# Altium PCB ledcube_v2.PcbDoc (part 4 of 18)
Units mil, origin at the board's own origin, x right, y up, seen from the top; angles counter-clockwise.
Board outline 3130 x 3300 mil, 2 copper layers (Top Layer, Bottom Layer); 188 components, 216 nets, 29515 pads, 250 vias.
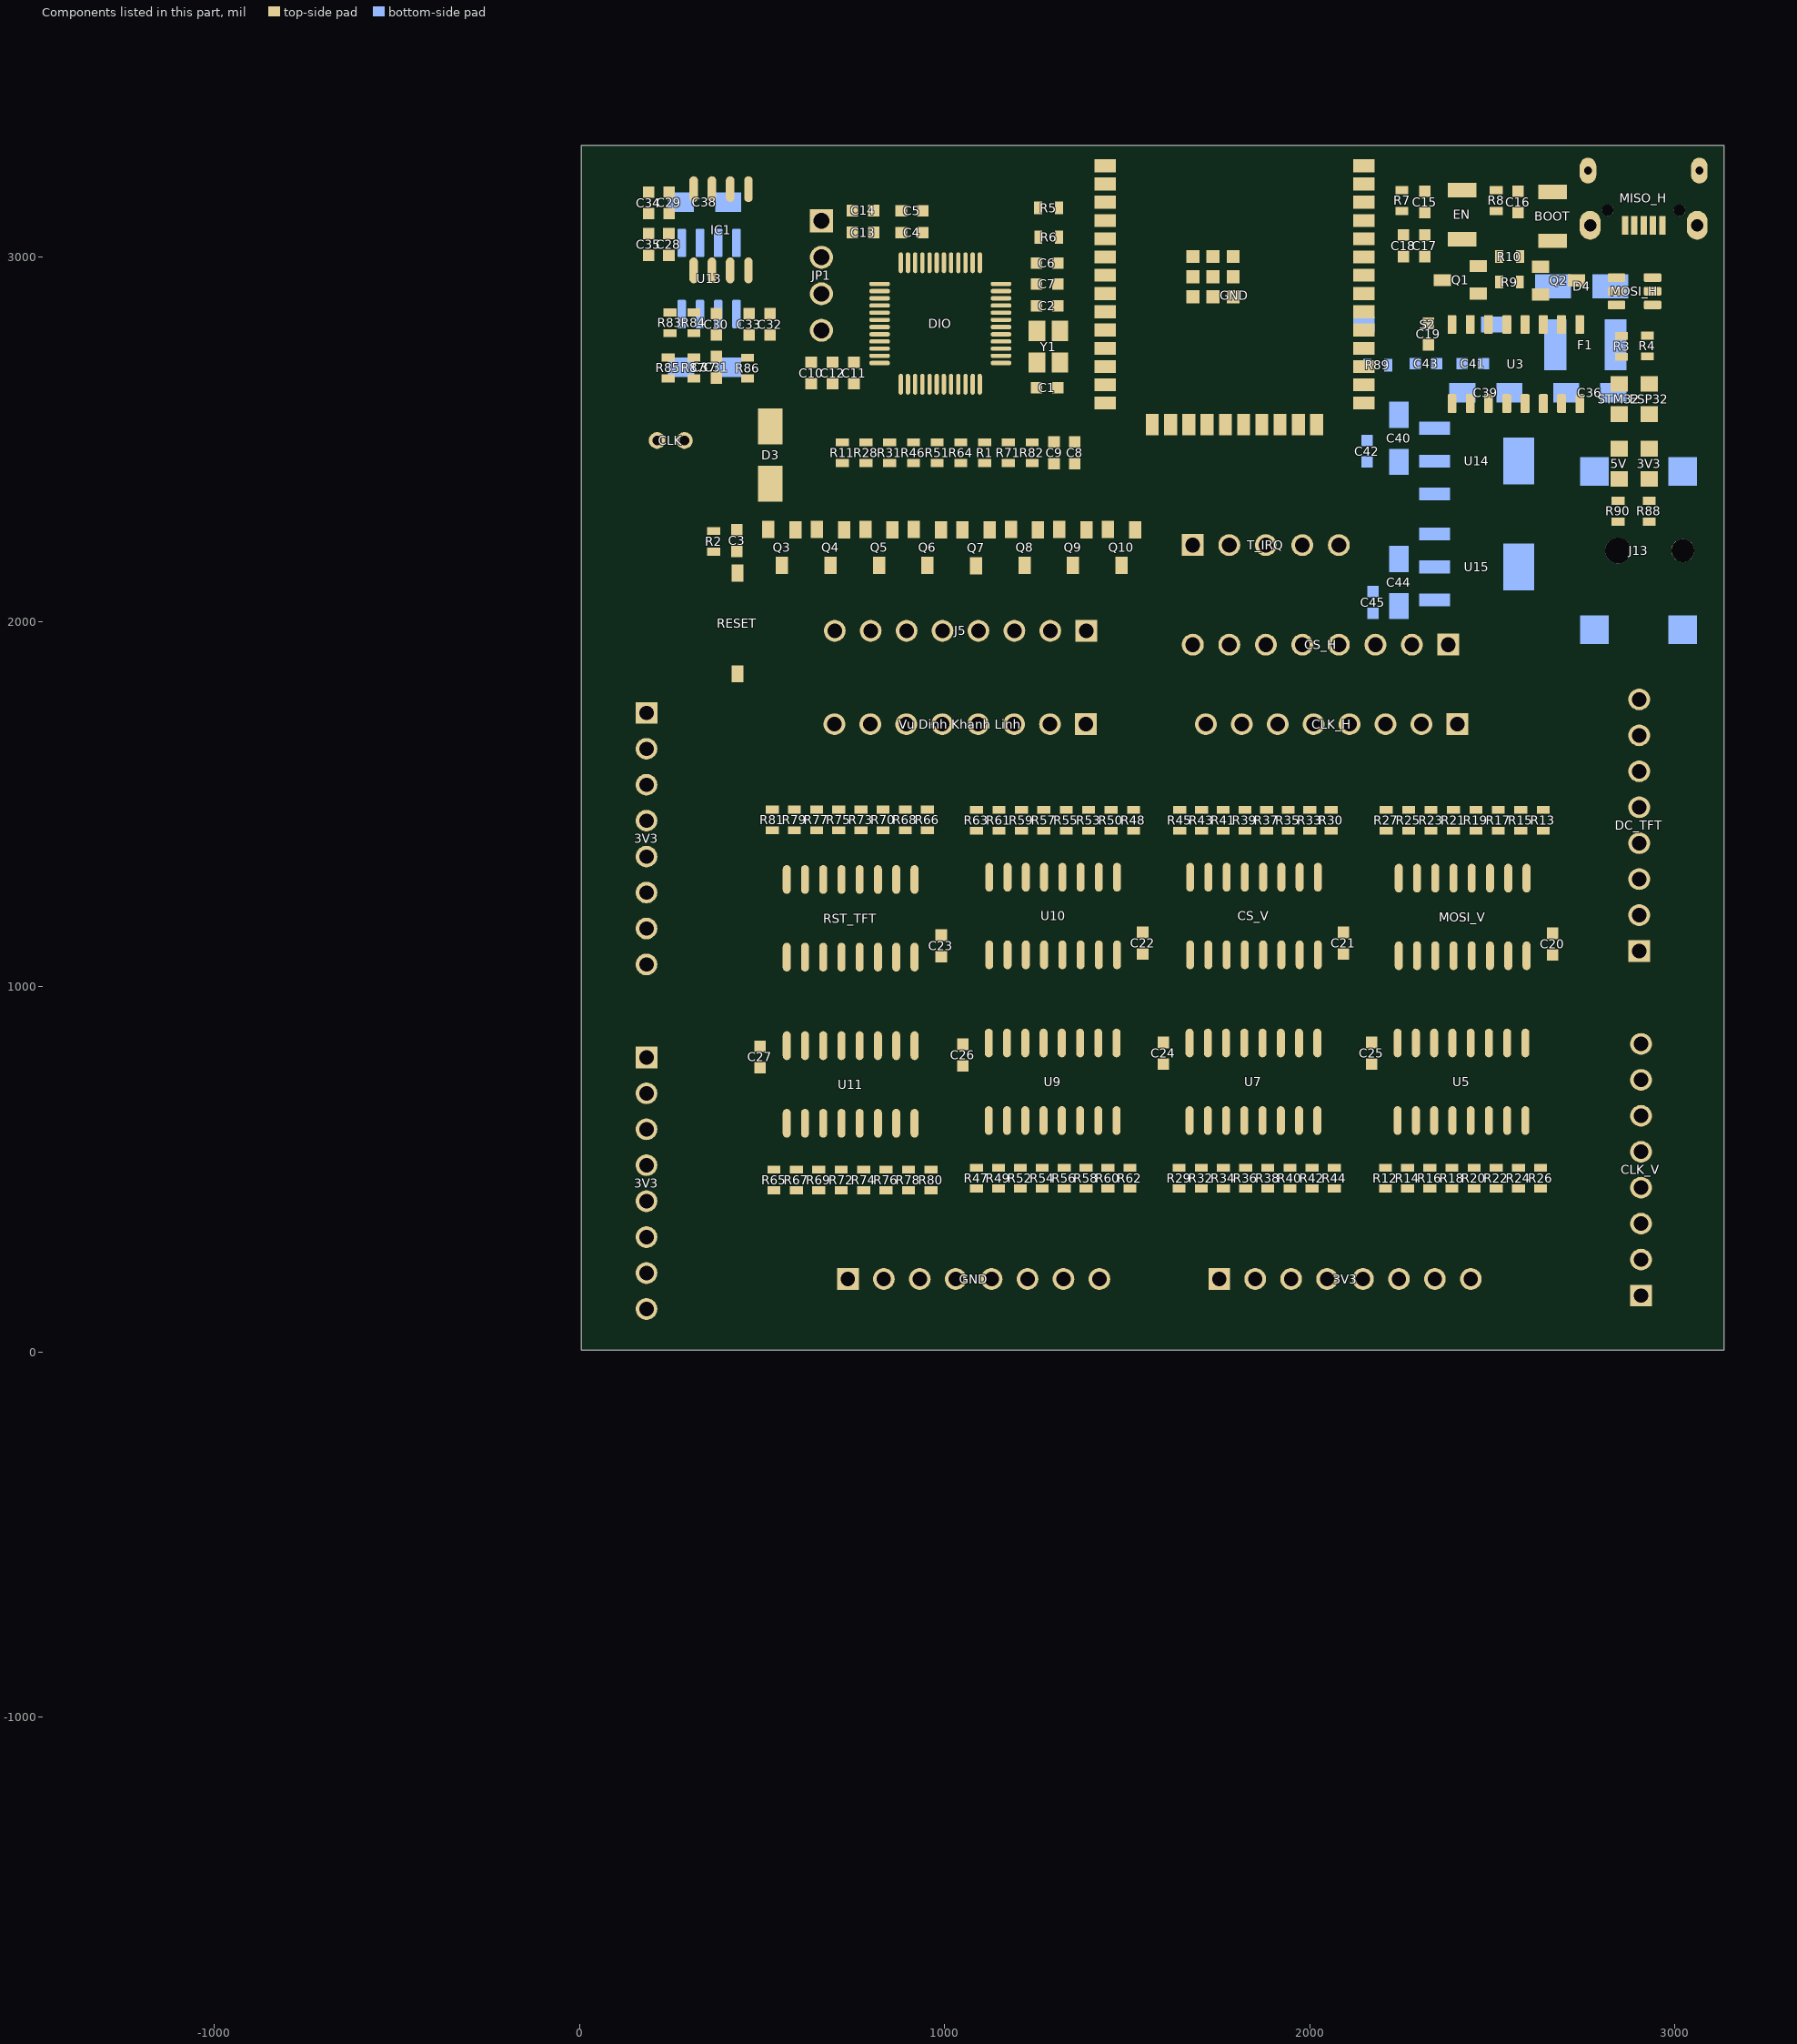
[diagram p3: the components of this part, seen from the top]

## Free pads (board coordinates) (continued)
  round 0 on Mech15: 1(-1373.58,-1738.24) 1(-1373.58,-1738.24) 1(-1373.58,-1737.36) 1(-1373.58,-1737.36) 1(-1373.58,-1737.3) 1(-1373.58,-1737.3) 1(-1373.58,-1736.41) 1(-1373.58,-1736.41) 1(-1373.53,-1735.77) 1(-1373.49,-1735.8) 1(-1373.46,-1735.28) 1(-1373.46,-1735.28) 1(-1373.46,-1735.17) 1(-1373.46,-1735.17) 1(-1373.46,-1735.17) 1(-1373.46,-1735.17) 1(-1373.46,-1735.16) 1(-1373.46,-1735.16) 1(-1373.46,-1735.06) 1(-1373.46,-1735.06) 1(-1373.44,-1737.33) 1(-1373.44,-1736.39) 1(-1373.41,-1735.28) 1(-1373.41,-1735.28) 1(-1373.41,-1735.18) 1(-1373.41,-1735.18) 1(-1373.41,-1735.17) 1(-1373.41,-1735.17) 1(-1373.41,-1735.17) 1(-1373.41,-1735.17) 1(-1373.41,-1735.06) 1(-1373.41,-1735.06) 1(-1373.41,-1735.61) 1(-1373.41,-1735.61) 1(-1373.41,-1735.52) 1(-1373.41,-1735.52) 1(-1373.4,-1735.49) 1(-1373.4,-1735.49) 1(-1373.4,-1735.39) 1(-1373.4,-1735.39) 1(-1373.4,-1735.28) 1(-1373.4,-1735.28) 1(-1373.4,-1735.27) 1(-1373.4,-1735.27) 1(-1373.4,-1735.17) 1(-1373.4,-1735.17) 1(-1373.4,-1735.17) 1(-1373.4,-1735.17) 1(-1373.4,-1735.06) 1(-1373.4,-1735.06) 1(-1373.36,-1735.28) 1(-1373.36,-1735.28) 1(-1373.36,-1735.17) 1(-1373.36,-1735.17) 1(-1373.36,-1735.17) 1(-1373.36,-1735.17) 1(-1373.36,-1735.07) 1(-1373.36,-1735.07) 1(-1373.36,-1735.06) 1(-1373.36,-1735.06) 1(-1373.36,-1735.61) 1(-1373.36,-1735.61) 1(-1373.36,-1735.52) 1(-1373.36,-1735.52) 1(-1373.35,-1735.49) 1(-1373.35,-1735.49) 1(-1373.35,-1735.39) 1(-1373.35,-1735.39) 1(-1373.35,-1738.24) 1(-1373.35,-1738.24) 1(-1373.35,-1737.36) 1(-1373.35,-1737.36) 1(-1373.35,-1737.3) 1(-1373.35,-1737.3) 1(-1373.35,-1736.41) 1(-1373.35,-1736.41) 1(-1373.34,-1735.49) 1(-1373.34,-1735.49) 1(-1373.34,-1735.39) 1(-1373.34,-1735.39) 1(-1373.34,-1735.61) 1(-1373.34,-1735.61) 1(-1373.34,-1735.52) 1(-1373.34,-1735.52) 1(-1373.34,-1735.25) 1(-1373.34,-1735.25) 1(-1373.34,-1735.12) 1(-1373.34,-1735.12) 1(-1373.29,-1735.49) 1(-1373.29,-1735.49) 1(-1373.29,-1735.39) 1(-1373.29,-1735.39) 1(-1373.28,-1736.09) 1(-1373.28,-1736.09) 1(-1373.28,-1735.99) 1(-1373.28,-1735.99) 1(-1373.28,-1735.61) 1(-1373.28,-1735.61) 1(-1373.28,-1735.52) 1(-1373.28,-1735.52) 1(-1373.27,-1735.62) 1(-1373.27,-1735.62) 1(-1373.27,-1735.52) 1(-1373.27,-1735.52) 1(-1373.27,-1735.51) 1(-1373.27,-1735.51) 1(-1373.27,-1735.5) 1(-1373.27,-1735.5) 1(-1373.27,-1735.49) 1(-1373.27,-1735.49) 1(-1373.27,-1735.39) 1(-1373.27,-1735.39) 1(-1373.26,-1735.8) 1(-1373.23,-1736.09) 1(-1373.23,-1736.09) 1(-1373.23,-1735.99) 1(-1373.23,-1735.99) 1(-1373.23,-1735.62) 1(-1373.23,-1735.62) 1(-1373.23,-1735.51) 1(-1373.23,-1735.51) 1(-1373.23,-1735.5) 1(-1373.23,-1735.5) 1(-1373.23,-1735.39) 1(-1373.23,-1735.39) 1(-1373.22,-1735.77) 1(-1373.22,-1736.09) 1(-1373.22,-1736.09) 1(-1373.22,-1735.98) 1(-1373.22,-1735.98) 1(-1373.19,-1735.61) 1(-1373.19,-1735.61) 1(-1373.19,-1735.52) 1(-1373.19,-1735.52) 1(-1373.18,-1735.5) 1(-1373.18,-1735.5) 1(-1373.18,-1735.49) 1(-1373.18,-1735.49) 1(-1373.18,-1735.39) 1(-1373.18,-1735.39) 1(-1373.17,-1736.09) 1(-1373.17,-1736.09) 1(-1373.17,-1735.99) 1(-1373.17,-1735.99) 1(-1373.17,-1735.98) 1(-1373.17,-1735.98) 1(-1373.17,-1735.95) 1(-1373.17,-1735.95) 1(-1373.17,-1735.66) 1(-1373.17,-1735.66) 1(-1373.17,-1735.66) 1(-1373.15,-1737.5) 1(-1373.15,-1737.5) 1(-1373.15,-1737.5) 1(-1373.15,-1737.5) 1(-1373.15,-1737.4) 1(-1373.15,-1737.4) 1(-1373.15,-1735.95) 1(-1373.14,-1735.61) 1(-1373.14,-1735.61) 1(-1373.14,-1735.52) 1(-1373.14,-1735.52) 1(-1373.14,-1735.5) 1(-1373.14,-1735.5) 1(-1373.14,-1735.39) 1(-1373.14,-1735.39) 1(-1373.14,-1735.25) 1(-1373.14,-1735.25) 1(-1373.14,-1735.12) 1(-1373.14,-1735.12) 1(-1373.13,-1735.5) 1(-1373.13,-1735.5) 1(-1373.13,-1735.49) 1(-1373.13,-1735.49) 1(-1373.13,-1735.39) 1(-1373.13,-1735.39) 1(-1373.12,-1736.85) 1(-1373.12,-1736.85) 1(-1373.12,-1736.75) 1(-1373.12,-1736.75) 1(-1373.12,-1737.84) 1(-1373.12,-1737.84) 1(-1373.12,-1737.74) 1(-1373.12,-1737.74) 1(-1373.12,-1735.82) 1(-1373.12,-1735.82) 1(-1373.11,-1735.66) 1(-1373.11,-1735.66) 1(-1373.11,-1735.66) 1(-1373.11,-1735.66) 1(-1373.11,-1737.5) 1(-1373.11,-1737.5) 1(-1373.11,-1737.4) 1(-1373.11,-1737.4) 1(-1373.1,-1735.82) 1(-1373.1,-1735.82) 1(-1373.1,-1735.78) 1(-1373.09,-1735.66) 1(-1373.09,-1735.66) 1(-1373.09,-1735.66) 1(-1373.09,-1735.66) 1(-1373.08,-1735.82) 1(-1373.08,-1735.82) 1(-1373.08,-1735.5) 1(-1373.08,-1735.5) 1(-1373.08,-1735.39) 1(-1373.08,-1735.39) 1(-1373.08,-1737.59) 1(-1373.08,-1737.59) 1(-1373.08,-1737.47) 1(-1373.08,-1737.47) 1(-1373.08,-1737.13) 1(-1373.08,-1737.13) 1(-1373.08,-1737.01) 1(-1373.08,-1737.01) 1(-1373.07,-1736.85) 1(-1373.07,-1736.85) 1(-1373.07,-1736.75) 1(-1373.07,-1736.75) 1(-1373.07,-1735.33) 1(-1373.07,-1735.33) 1(-1373.07,-1735.24) 1(-1373.07,-1735.15) 1(-1373.07,-1735.07) 1(-1373.07,-1734.97) 1(-1373.07,-1734.97) 1(-1373.06,-1737.84) 1(-1373.06,-1737.84) 1(-1373.06,-1737.74) 1(-1373.06,-1737.74) 1(-1373.06,-1736.85) 1(-1373.06,-1736.85) 1(-1373.06,-1736.75) 1(-1373.06,-1736.75) 1(-1373.06,-1737.84) 1(-1373.06,-1737.84) 1(-1373.06,-1737.74) 1(-1373.06,-1737.74) 1(-1373.06,-1735.95) 1(-1373.04,-1735.95) 1(-1373.04,-1735.95) 1(-1373.04,-1735.66) 1(-1373.04,-1735.66) 1(-1373.04,-1735.66) 1(-1373.02,-1736.63) 1(-1373.02,-1736.63) 1(-1373.02,-1736.41) 1(-1373.02,-1736.41) 1(-1373.02,-1736.38) 1(-1373.02,-1736.38) 1(-1373.02,-1736.15) 1(-1373.02,-1736.15) 1(-1373.01,-1738.06) 1(-1373.01,-1735.63) 1(-1373.01,-1735.63) 1(-1373.01,-1735.62) 1(-1373.01,-1735.62) 1(-1373.01,-1735.53) 1(-1373.01,-1735.53) 1(-1373.01,-1735.51) 1(-1373.01,-1735.51) 1(-1373.01,-1735.21) 1(-1373.01,-1735.11) 1(-1373.01,-1735.11) 1(-1373.01,-1736.85) 1(-1373.01,-1736.85) 1(-1373.01,-1736.75) 1(-1373.01,-1736.75) 1(-1373,-1737.84) 1(-1373,-1737.84) 1(-1373,-1737.74) 1(-1373,-1737.74) 1(-1373,-1736.85) 1(-1373,-1736.85) 1(-1373,-1736.75) 1(-1373,-1736.75) 1(-1373,-1737.84) 1(-1373,-1737.84) 1(-1373,-1737.74) 1(-1373,-1737.74) 1(-1372.99,-1738.19) 1(-1372.99,-1738.19) 1(-1372.99,-1737.97) 1(-1372.99,-1737.97) 1(-1372.97,-1735.63) 1(-1372.97,-1735.63) 1(-1372.97,-1735.53) 1(-1372.97,-1735.53) 1(-1372.95,-1735.63) 1(-1372.95,-1735.63) 1(-1372.95,-1735.62) 1(-1372.95,-1735.62) 1(-1372.95,-1735.53) 1(-1372.95,-1735.53) 1(-1372.95,-1736.85) 1(-1372.95,-1736.85) 1(-1372.95,-1736.75) 1(-1372.95,-1736.75) 1(-1372.94,-1736.85) 1(-1372.94,-1736.85) 1(-1372.94,-1736.75) 1(-1372.94,-1736.75) 1(-1372.94,-1737.84) 1(-1372.94,-1737.84) 1(-1372.94,-1737.74) 1(-1372.94,-1737.74) 1(-1372.94,-1737.84) 1(-1372.94,-1737.84) 1(-1372.94,-1737.74) 1(-1372.94,-1737.74) 1(-1372.93,-1735.85) 1(-1372.93,-1735.85) 1(-1372.93,-1735.75) 1(-1372.93,-1735.75) 1(-1372.91,-1735.51) 1(-1372.91,-1735.51) 1(-1372.91,-1735.21) 1(-1372.91,-1735.11) 1(-1372.91,-1735.11) 1(-1372.91,-1735.63) 1(-1372.91,-1735.63) 1(-1372.91,-1735.53) 1(-1372.91,-1735.53) 1(-1372.9,-1735.22) 1(-1372.9,-1735.22) 1(-1372.9,-1735.17) 1(-1372.9,-1735.17) 1(-1372.9,-1735.16) 1(-1372.9,-1735.16) 1(-1372.9,-1735.11) 1(-1372.9,-1735.11) 1(-1372.9,-1735.63) 1(-1372.9,-1735.63) 1(-1372.9,-1735.62) 1(-1372.9,-1735.62) 1(-1372.9,-1735.53) 1(-1372.9,-1735.53) 1(-1372.89,-1736.85) 1(-1372.89,-1736.85) 1(-1372.89,-1736.75) 1(-1372.89,-1736.75) 1(-1372.88,-1736.85) 1(-1372.88,-1736.85) 1(-1372.88,-1736.75) 1(-1372.88,-1736.75) 1(-1372.88,-1737.84) 1(-1372.88,-1737.84) 1(-1372.88,-1737.74) 1(-1372.88,-1737.74) 1(-1372.88,-1735.85) 1(-1372.88,-1735.85) 1(-1372.88,-1735.75) 1(-1372.88,-1735.75) 1(-1372.87,-1737.84) 1(-1372.87,-1737.84) 1(-1372.87,-1737.74) 1(-1372.87,-1737.74) 1(-1372.87,-1735.85) 1(-1372.87,-1735.85) 1(-1372.87,-1735.75) 1(-1372.87,-1735.75) 1(-1372.85,-1735.63) 1(-1372.85,-1735.63) 1(-1372.85,-1735.53) 1(-1372.85,-1735.53) 1(-1372.83,-1736.85) 1(-1372.83,-1736.85) 1(-1372.83,-1736.75) 1(-1372.83,-1736.75) 1(-1372.82,-1736.85) 1(-1372.82,-1736.85) 1(-1372.82,-1736.75) 1(-1372.82,-1736.75) 1(-1372.82,-1737.84) 1(-1372.82,-1737.84) 1(-1372.82,-1737.74) 1(-1372.82,-1737.74) 1(-1372.81,-1735.85) 1(-1372.81,-1735.85) 1(-1372.81,-1735.75) 1(-1372.81,-1735.75) 1(-1372.81,-1737.84) 1(-1372.81,-1737.84) 1(-1372.81,-1737.74) 1(-1372.81,-1737.74) 1(-1372.8,-1735.85) 1(-1372.8,-1735.85) 1(-1372.8,-1735.75) 1(-1372.8,-1735.75) 1(-1372.8,-1735.22) 1(-1372.8,-1735.22) 1(-1372.8,-1735.16) 1(-1372.8,-1735.16) 1(-1372.8,-1735.22) 1(-1372.8,-1735.22) 1(-1372.8,-1735.17) 1(-1372.8,-1735.17) 1(-1372.8,-1735.16) 1(-1372.8,-1735.16) 1(-1372.8,-1735.11) 1(-1372.8,-1735.11) 1(-1372.77,-1735.22) 1(-1372.77,-1735.22) 1(-1372.77,-1735.17) 1(-1372.77,-1735.17) 1(-1372.77,-1735.16) 1(-1372.77,-1735.16) 1(-1372.77,-1735.11) 1(-1372.77,-1735.11) 1(-1372.77,-1736.85) 1(-1372.77,-1736.85) 1(-1372.77,-1736.75) 1(-1372.77,-1736.75) 1(-1372.76,-1736.85) 1(-1372.76,-1736.85) 1(-1372.76,-1736.75) 1(-1372.76,-1736.75) 1(-1372.76,-1737.84) 1(-1372.76,-1737.84) 1(-1372.76,-1737.74) 1(-1372.76,-1737.74) 1(-1372.75,-1737.84) 1(-1372.75,-1737.84) 1(-1372.75,-1737.74) 1(-1372.75,-1737.74) 1(-1372.75,-1735.85) 1(-1372.75,-1735.85) 1(-1372.75,-1735.75) 1(-1372.75,-1735.75) 1(-1372.74,-1735.85) 1(-1372.74,-1735.85) 1(-1372.74,-1735.75) 1(-1372.74,-1735.75) 1(-1372.71,-1736.85) 1(-1372.71,-1736.85) 1(-1372.71,-1736.75) 1(-1372.71,-1736.75) 1(-1372.7,-1736.85) 1(-1372.7,-1736.85) 1(-1372.7,-1736.75) 1(-1372.7,-1736.75) 1(-1372.7,-1737.84) 1(-1372.7,-1737.84) 1(-1372.7,-1737.74) 1(-1372.7,-1737.74) 1(-1372.69,-1737.84) 1(-1372.69,-1737.84) 1(-1372.69,-1737.74) 1(-1372.69,-1737.74) 1(-1372.69,-1737.59) 1(-1372.69,-1737.59) 1(-1372.69,-1737.47) 1(-1372.69,-1737.47) 1(-1372.69,-1737.13) 1(-1372.69,-1737.13) 1(-1372.69,-1737.01) 1(-1372.69,-1737.01) 1(-1372.68,-1735.85) 1(-1372.68,-1735.85) 1(-1372.68,-1735.75) 1(-1372.68,-1735.75) 1(-1372.67,-1735.85) 1(-1372.67,-1735.85) 1(-1372.67,-1735.75) 1(-1372.67,-1735.75) 1(-1372.67,-1735.22) 1(-1372.67,-1735.22) 1(-1372.67,-1735.16) 1(-1372.67,-1735.16) 1(-1372.66,-1735.22) 1(-1372.66,-1735.22) 1(-1372.66,-1735.17) 1(-1372.66,-1735.17) 1(-1372.66,-1735.16) 1(-1372.66,-1735.16) 1(-1372.66,-1735.11) 1(-1372.66,-1735.11) 1(-1372.66,-1737.2) 1(-1372.66,-1737.2) 1(-1372.66,-1737.09) 1(-1372.66,-1737.09) 1(-1372.65,-1736.85) 1(-1372.65,-1736.85) 1(-1372.65,-1736.75) 1(-1372.65,-1736.75) 1(-1372.63,-1737.84) 1(-1372.63,-1737.84) 1(-1372.63,-1737.74) 1(-1372.63,-1737.74) 1(-1372.62,-1735.85) 1(-1372.62,-1735.85) 1(-1372.62,-1735.75) 1(-1372.62,-1735.75) 1(-1372.61,-1737.2) 1(-1372.61,-1737.2) 1(-1372.61,-1737.1) 1(-1372.61,-1737.1) 1(-1372.61,-1737.09) 1(-1372.61,-1737.09) 1(-1372.61,-1735.85) 1(-1372.61,-1735.85) 1(-1372.61,-1735.75) 1(-1372.61,-1735.75) 1(-1372.6,-1737.5) 1(-1372.6,-1737.5) 1(-1372.6,-1737.49) 1(-1372.6,-1737.49) 1(-1372.6,-1737.39) 1(-1372.6,-1737.39) 1(-1372.57,-1736.85) 1(-1372.57,-1736.85) 1(-1372.57,-1736.75) 1(-1372.57,-1736.75) 1(-1372.56,-1737.83) 1(-1372.56,-1737.83) 1(-1372.56,-1737.73) 1(-1372.56,-1737.73) 1(-1372.55,-1735.85) 1(-1372.55,-1735.85) 1(-1372.55,-1735.75) 1(-1372.55,-1735.75) 1(-1372.55,-1737.5) 1(-1372.55,-1737.5) 1(-1372.55,-1737.39) 1(-1372.55,-1737.39) 1(-1372.54,-1735.85) 1(-1372.54,-1735.85) 1(-1372.54,-1735.75) 1(-1372.54,-1735.75) 1(-1372.52,-1737.58) 1(-1372.52,-1737.58) 1(-1372.52,-1737.46) 1(-1372.52,-1737.46) 1(-1372.52,-1737.13) 1(-1372.52,-1737.13) 1(-1372.52,-1737) 1(-1372.52,-1737) 1(-1372.51,-1736.85) 1(-1372.51,-1736.85) 1(-1372.51,-1736.75) 1(-1372.51,-1736.75) 1(-1372.51,-1737.83) 1(-1372.51,-1737.83) 1(-1372.51,-1737.73) 1(-1372.51,-1737.73) 1(-1372.5,-1737.83) 1(-1372.5,-1737.83) 1(-1372.5,-1737.73) 1(-1372.5,-1737.73) 1(-1372.5,-1736.85) 1(-1372.5,-1736.85) 1(-1372.5,-1736.75) 1(-1372.5,-1736.75) 1(-1372.49,-1735.85) 1(-1372.49,-1735.85) 1(-1372.49,-1735.75) 1(-1372.49,-1735.75) 1(-1372.48,-1735.85) 1(-1372.48,-1735.85) 1(-1372.48,-1735.75) 1(-1372.48,-1735.75) 1(-1372.45,-1737.83) 1(-1372.45,-1737.83) 1(-1372.45,-1737.73) 1(-1372.45,-1737.73) 1(-1372.45,-1736.85) 1(-1372.45,-1736.85) 1(-1372.45,-1736.75) 1(-1372.45,-1736.75) 1(-1372.44,-1737.83) 1(-1372.44,-1737.83) 1(-1372.44,-1737.73) 1(-1372.44,-1737.73) 1(-1372.44,-1736.85) 1(-1372.44,-1736.85) 1(-1372.44,-1736.75) 1(-1372.44,-1736.75) 1(-1372.42,-1735.85) 1(-1372.42,-1735.85) 1(-1372.42,-1735.75) 1(-1372.42,-1735.75) 1(-1372.41,-1735.85) 1(-1372.41,-1735.85) 1(-1372.41,-1735.75) 1(-1372.41,-1735.75) 1(-1372.4,-1735.42) 1(-1372.4,-1735.42) 1(-1372.4,-1735.37) 1(-1372.4,-1735.37) 1(-1372.4,-1735.36) 1(-1372.4,-1735.36) 1(-1372.4,-1735.31) 1(-1372.4,-1735.31) 1(-1372.4,-1735.3) 1(-1372.4,-1735.3) 1(-1372.4,-1735.25) 1(-1372.4,-1735.25) 1(-1372.4,-1735.64) 1(-1372.4,-1735.64) 1(-1372.4,-1735.6) 1(-1372.4,-1735.6) 1(-1372.39,-1735.6) 1(-1372.39,-1735.6) 1(-1372.39,-1737.83) 1(-1372.39,-1737.83) 1(-1372.39,-1737.73) 1(-1372.39,-1737.73) 1(-1372.39,-1735.15) 1(-1372.39,-1735.15) 1(-1372.39,-1735.1) 1(-1372.39,-1735.1) 1(-1372.39,-1735.23) 1(-1372.39,-1735.23) 1(-1372.39,-1735.18) 1(-1372.39,-1735.18) 1(-1372.39,-1736.85) 1(-1372.39,-1736.85) 1(-1372.39,-1736.75) 1(-1372.39,-1736.75) 1(-1372.38,-1737.83) 1(-1372.38,-1737.83) 1(-1372.38,-1737.73) 1(-1372.38,-1737.73) 1(-1372.38,-1736.85) 1(-1372.38,-1736.85) 1(-1372.38,-1736.75) 1(-1372.38,-1736.75) 1(-1372.36,-1735.85) 1(-1372.36,-1735.85) 1(-1372.36,-1735.75) 1(-1372.36,-1735.75) 1(-1372.35,-1735.85) 1(-1372.35,-1735.85) 1(-1372.35,-1735.84) 1(-1372.35,-1735.84) 1(-1372.35,-1735.74) 1(-1372.35,-1735.74) 1(-1372.33,-1737.83) 1(-1372.33,-1737.83) 1(-1372.33,-1737.73) 1(-1372.33,-1737.73) 1(-1372.33,-1736.85) 1(-1372.33,-1736.85) 1(-1372.33,-1736.75) 1(-1372.33,-1736.75) 1(-1372.32,-1737.83) 1(-1372.32,-1737.83) 1(-1372.32,-1737.73) 1(-1372.32,-1737.73) 1(-1372.32,-1736.85) 1(-1372.32,-1736.85) 1(-1372.32,-1736.75) 1(-1372.32,-1736.75) 1(-1372.31,-1735.6) 1(-1372.31,-1735.59) 1(-1372.3,-1735.85) 1(-1372.3,-1735.85) 1(-1372.3,-1735.74) 1(-1372.3,-1735.74) 1(-1372.3,-1735.42) 1(-1372.3,-1735.42) 1(-1372.3,-1735.36) 1(-1372.3,-1735.36) 1(-1372.3,-1735.3) 1(-1372.3,-1735.3) 1(-1372.29,-1735.85) 1(-1372.29,-1735.85) 1(-1372.29,-1735.84) 1(-1372.29,-1735.84) 1(-1372.29,-1735.74) 1(-1372.29,-1735.74) 1(-1372.29,-1735.42) 1(-1372.29,-1735.42) 1(-1372.29,-1735.37) 1(-1372.29,-1735.37) 1(-1372.29,-1735.36) 1(-1372.29,-1735.36) 1(-1372.29,-1735.31) 1(-1372.29,-1735.31) 1(-1372.29,-1735.3) 1(-1372.29,-1735.3) 1(-1372.29,-1735.25) 1(-1372.29,-1735.25) 1(-1372.29,-1735.15) 1(-1372.29,-1735.15) 1(-1372.29,-1735.1) 1(-1372.29,-1735.1) 1(-1372.29,-1735.64) 1(-1372.29,-1735.64) 1(-1372.29,-1735.6) 1(-1372.29,-1735.6) 1(-1372.29,-1735.23) 1(-1372.29,-1735.23) 1(-1372.29,-1735.18) 1(-1372.29,-1735.18) 1(-1372.27,-1737.83) 1(-1372.27,-1737.83) 1(-1372.27,-1737.73) 1(-1372.27,-1737.73) 1(-1372.26,-1736.85) 1(-1372.26,-1736.85) 1(-1372.26,-1736.75) 1(-1372.26,-1736.75) 1(-1372.26,-1737.83) 1(-1372.26,-1737.83) 1(-1372.26,-1737.73) 1(-1372.26,-1737.73) 1(-1372.26,-1736.85) 1(-1372.26,-1736.85) 1(-1372.26,-1736.75) 1(-1372.26,-1736.75) 1(-1372.25,-1735.85) 1(-1372.25,-1735.85) 1(-1372.25,-1735.74) 1(-1372.25,-1735.74) 1(-1372.21,-1737.83) 1(-1372.21,-1737.83) 1(-1372.21,-1737.73) 1(-1372.21,-1737.73) 1(-1372.2,-1737.83) 1(-1372.2,-1737.83) 1(-1372.2,-1737.73) 1(-1372.2,-1737.73) 1(-1372.2,-1736.85) 1(-1372.2,-1736.85) 1(-1372.2,-1736.75) 1(-1372.2,-1736.75) 1(-1372.2,-1736.85) 1(-1372.2,-1736.85) 1(-1372.2,-1736.75) 1(-1372.2,-1736.75) 1(-1372.19,-1735.72) 1(-1372.19,-1735.72) 1(-1372.19,-1735.69) 1(-1372.19,-1734.97) 1(-1372.19,-1734.95) 1(-1372.19,-1734.95) 1(-1372.19,-1734.95) 1(-1372.19,-1734.72) 1(-1372.19,-1734.72) 1(-1372.15,-1737.83) 1(-1372.15,-1737.83) 1(-1372.15,-1737.73) 1(-1372.15,-1737.73) 1(-1372.14,-1737.83) 1(-1372.14,-1737.83) 1(-1372.14,-1737.73) 1(-1372.14,-1737.73) 1(-1372.14,-1736.85) 1(-1372.14,-1736.85) 1(-1372.14,-1736.75) 1(-1372.14,-1736.75) 1(-1372.14,-1736.63) 1(-1372.14,-1736.63) 1(-1372.14,-1736.41) 1(-1372.14,-1736.41) 1(-1372.14,-1736.38) 1(-1372.14,-1736.38) 1(-1372.14,-1736.15) 1(-1372.14,-1736.15) 1(-1372.13,-1736.85) 1(-1372.13,-1736.85) 1(-1372.13,-1736.75) 1(-1372.13,-1736.75) 1(-1372.13,-1737.58) 1(-1372.13,-1737.58) 1(-1372.13,-1737.46) 1(-1372.13,-1737.46) 1(-1372.13,-1737.13) 1(-1372.13,-1737.13) 1(-1372.13,-1737) 1(-1372.13,-1737) 1(-1372.11,-1736.54) 1(-1372.11,-1736.28) 1(-1372.11,-1737.19) 1(-1372.11,-1737.19) 1(-1372.11,-1737.09) 1(-1372.11,-1737.09) 1(-1372.1,-1738.19) 1(-1372.1,-1738.19) 1(-1372.1,-1737.97) 1(-1372.1,-1737.97) 1(-1372.09,-1737.83) 1(-1372.09,-1737.83) 1(-1372.09,-1737.73) 1(-1372.09,-1737.73) 1(-1372.09,-1735.72) 1(-1372.08,-1736.85) 1(-1372.08,-1736.85) 1(-1372.08,-1736.75) 1(-1372.08,-1736.75) 1(-1372.06,-1737.19) 1(-1372.06,-1737.19) 1(-1372.06,-1737.09) 1(-1372.06,-1737.09) 1(-1372.06,-1737.09) 1(-1372.06,-1737.09) 1(-1372.05,-1737.49) 1(-1372.05,-1737.49) 1(-1372.05,-1737.49) 1(-1372.05,-1737.49) 1(-1372.05,-1737.39) 1(-1372.05,-1737.39) 1(-1372.01,-1736.38) 1(-1372.01,-1736.38) 1(-1372.01,-1736.27) 1(-1372.01,-1736.27) 1(-1372.01,-1737.83) 1(-1372.01,-1737.83) 1(-1372.01,-1737.73) 1(-1372.01,-1737.73) 1(-1372.01,-1736.85) 1(-1372.01,-1736.85) 1(-1372.01,-1736.75) 1(-1372.01,-1736.75) 1(-1372.01,-1736.63) 1(-1372.01,-1736.63) 1(-1372.01,-1736.41) 1(-1372.01,-1736.41) 1(-1372,-1737.49) 1(-1372,-1737.49) 1(-1372,-1737.39) 1(-1372,-1737.39) 1(-1372,-1738.06) 1(-1371.97,-1737.58) 1(-1371.97,-1737.58) 1(-1371.97,-1737.46) 1(-1371.97,-1737.46) 1(-1371.97,-1737.13) 1(-1371.97,-1737.13) 1(-1371.97,-1737) 1(-1371.97,-1737) 1(-1371.97,-1738.19) 1(-1371.97,-1738.19) 1(-1371.97,-1737.97) 1(-1371.97,-1737.97) 1(-1371.95,-1737.83) 1(-1371.95,-1737.83) 1(-1371.95,-1737.73) 1(-1371.95,-1737.73) 1(-1371.95,-1736.85) 1(-1371.95,-1736.85) 1(-1371.95,-1736.75) 1(-1371.95,-1736.75) 1(-1371.95,-1737.83) 1(-1371.95,-1737.83) 1(-1371.95,-1737.73) 1(-1371.95,-1737.73) 1(-1371.95,-1736.85) 1(-1371.95,-1736.85) 1(-1371.95,-1736.75) 1(-1371.95,-1736.75) 1(-1371.89,-1737.83) 1(-1371.89,-1737.83) 1(-1371.89,-1737.73) 1(-1371.89,-1737.73) 1(-1371.89,-1736.85) 1(-1371.89,-1736.85) 1(-1371.89,-1736.75) 1(-1371.89,-1736.75) 1(-1371.89,-1736.85) 1(-1371.89,-1736.85) 1(-1371.89,-1736.75) 1(-1371.89,-1736.75) 1(-1371.89,-1737.83) 1(-1371.89,-1737.83) 1(-1371.89,-1737.73) 1(-1371.89,-1737.73) 1(-1371.83,-1736.85) 1(-1371.83,-1736.85) 1(-1371.83,-1736.75) 1(-1371.83,-1736.75) 1(-1371.83,-1737.83) 1(-1371.83,-1737.83) 1(-1371.83,-1737.73) 1(-1371.83,-1737.73) 1(-1371.83,-1736.85) 1(-1371.83,-1736.85) 1(-1371.83,-1736.75) 1(-1371.83,-1736.75) 1(-1371.83,-1737.83) 1(-1371.83,-1737.83) 1(-1371.83,-1737.73) 1(-1371.83,-1737.73) 1(-1371.78,-1736.85) 1(-1371.78,-1736.85) 1(-1371.78,-1736.75) 1(-1371.78,-1736.75) 1(-1371.77,-1737.83) 1(-1371.77,-1737.83) 1(-1371.77,-1737.73) 1(-1371.77,-1737.73) 1(-1371.77,-1736.85) 1(-1371.77,-1736.85) 1(-1371.77,-1736.75) 1(-1371.77,-1736.75) 1(-1371.77,-1737.83) 1(-1371.77,-1737.83) 1(-1371.77,-1737.73) 1(-1371.77,-1737.73) 1(-1371.72,-1736.85) 1(-1371.72,-1736.85) 1(-1371.72,-1736.75) 1(-1371.72,-1736.75) 1(-1371.71,-1737.83) 1(-1371.71,-1737.83) 1(-1371.71,-1737.73) 1(-1371.71,-1737.73) 1(-1371.71,-1736.85) 1(-1371.71,-1736.85) 1(-1371.71,-1736.75) 1(-1371.71,-1736.75) 1(-1371.71,-1737.83) 1(-1371.71,-1737.83) 1(-1371.71,-1737.73) 1(-1371.71,-1737.73) 1(-1371.66,-1736.85) 1(-1371.66,-1736.85) 1(-1371.66,-1736.75) 1(-1371.66,-1736.75) 1(-1371.65,-1736.85) 1(-1371.65,-1736.85) 1(-1371.65,-1736.75) 1(-1371.65,-1736.75) 1(-1371.65,-1737.83) 1(-1371.65,-1737.83) 1(-1371.65,-1737.73) 1(-1371.65,-1737.73) 1(-1371.65,-1737.83) 1(-1371.65,-1737.83) 1(-1371.65,-1737.73) 1(-1371.65,-1737.73) 1(-1371.6,-1736.85) 1(-1371.6,-1736.85) 1(-1371.6,-1736.75) 1(-1371.6,-1736.75) 1(-1371.59,-1736.85) 1(-1371.59,-1736.85) 1(-1371.59,-1736.75) 1(-1371.59,-1736.75) 1(-1371.59,-1737.83) 1(-1371.59,-1737.83) 1(-1371.59,-1737.73) 1(-1371.59,-1737.73) 1(-1371.58,-1737.83) 1(-1371.58,-1737.83) 1(-1371.58,-1737.73) 1(-1371.58,-1737.73) 1(-1371.58,-1737.58) 1(-1371.58,-1737.58) 1(-1371.58,-1737.46) 1(-1371.58,-1737.46) 1(-1371.58,-1737.13) 1(-1371.58,-1737.13) 1(-1371.58,-1737) 1(-1371.58,-1737) 1(-1371.57,-1735.72) 1(-1371.56,-1737.19) 1(-1371.56,-1737.19) 1(-1371.56,-1737.09) 1(-1371.56,-1737.09) 1(-1371.54,-1736.85) 1(-1371.54,-1736.85) 1(-1371.54,-1736.75) 1(-1371.54,-1736.75) 1(-1371.53,-1737.83) 1(-1371.53,-1737.83) 1(-1371.53,-1737.73) 1(-1371.53,-1737.73) 1(-1371.51,-1737.19) 1(-1371.51,-1737.19) 1(-1371.51,-1737.09) 1(-1371.51,-1737.09) 1(-1371.51,-1737.09) 1(-1371.51,-1737.09) 1(-1371.48,-1735.72) 1(-1371.48,-1735.72) 1(-1371.48,-1735.69) 1(-1371.48,-1734.97) 1(-1371.48,-1734.95) 1(-1371.48,-1734.95) 1(-1371.48,-1734.95) 1(-1371.48,-1734.72) 1(-1371.48,-1734.72) 1(-1371.48,-1737.49) 1(-1371.48,-1737.49) 1(-1371.48,-1737.49) 1(-1371.48,-1737.49) 1(-1371.48,-1737.39) 1(-1371.48,-1737.39) 1(-1371.44,-1737.83) 1(-1371.44,-1737.83) 1(-1371.44,-1737.73) 1(-1371.44,-1737.73) 1(-1371.44,-1736.85) 1(-1371.44,-1736.85) 1(-1371.44,-1736.75) 1(-1371.44,-1736.75) 1(-1371.43,-1737.49) 1(-1371.43,-1737.49) 1(-1371.43,-1737.39) 1(-1371.43,-1737.39) 1(-1371.4,-1737.58) 1(-1371.4,-1737.58) 1(-1371.4,-1737.46) 1(-1371.4,-1737.46) 1(-1371.4,-1737.13) 1(-1371.4,-1737.13) 1(-1371.4,-1737.01) 1(-1371.4,-1737.01) 1(-1371.4,-1735.16) 1(-1371.4,-1735.16) 1(-1371.4,-1735.06) 1(-1371.4,-1735.06) 1(-1371.39,-1735.28) 1(-1371.39,-1735.28) 1(-1371.39,-1735.28) 1(-1371.39,-1735.28) 1(-1371.39,-1735.18) 1(-1371.39,-1735.18) 1(-1371.39,-1737.83) 1(-1371.39,-1737.83) 1(-1371.39,-1737.73) 1(-1371.39,-1737.73) 1(-1371.39,-1736.85) 1(-1371.39,-1736.85) 1(-1371.39,-1736.75) 1(-1371.39,-1736.75) 1(-1371.38,-1737.83) 1(-1371.38,-1737.83) 1(-1371.38,-1737.73) 1(-1371.38,-1737.73) 1(-1371.38,-1736.85) 1(-1371.38,-1736.85) 1(-1371.38,-1736.75) 1(-1371.38,-1736.75) 1(-1371.35,-1735.16) 1(-1371.35,-1735.16) 1(-1371.35,-1735.06) 1(-1371.35,-1735.06) 1(-1371.35,-1735.28) 1(-1371.35,-1735.28) 1(-1371.35,-1735.18) 1(-1371.35,-1735.18) 1(-1371.33,-1735.28) 1(-1371.33,-1735.28) 1(-1371.33,-1735.28) 1(-1371.33,-1735.28) 1(-1371.33,-1735.18) 1(-1371.33,-1735.18) 1(-1371.33,-1735.16) 1(-1371.33,-1735.16) 1(-1371.33,-1735.06) 1(-1371.33,-1735.06) 1(-1371.33,-1737.83) 1(-1371.33,-1737.83) 1(-1371.33,-1737.73) 1(-1371.33,-1737.73) 1(-1371.33,-1736.85) 1(-1371.33,-1736.85) 1(-1371.33,-1736.75) 1(-1371.33,-1736.75) 1(-1371.32,-1737.83) 1(-1371.32,-1737.83) 1(-1371.32,-1737.73) 1(-1371.32,-1737.73) 1(-1371.32,-1735.52) 1(-1371.32,-1735.52) 1(-1371.32,-1735.52) 1(-1371.32,-1735.52) 1(-1371.32,-1735.42) 1(-1371.32,-1735.42) 1(-1371.32,-1736.85) 1(-1371.32,-1736.85) 1(-1371.32,-1736.75) 1(-1371.32,-1736.75) 1(-1371.29,-1735.67) 1(-1371.29,-1735.66) 1(-1371.29,-1735.28) 1(-1371.29,-1735.28) 1(-1371.29,-1735.18) 1(-1371.29,-1735.18) 1(-1371.29,-1735.16) 1(-1371.29,-1735.16) 1(-1371.29,-1735.06) 1(-1371.29,-1735.06) 1(-1371.29,-1735.06) 1(-1371.29,-1735.06) 1(-1371.28,-1735.52) 1(-1371.28,-1735.52) 1(-1371.28,-1735.42) 1(-1371.28,-1735.42) 1(-1371.27,-1737.83) 1(-1371.27,-1737.83) 1(-1371.27,-1737.73) 1(-1371.27,-1737.73) 1(-1371.27,-1736.85) 1(-1371.27,-1736.85) 1(-1371.27,-1736.75) 1(-1371.27,-1736.75) 1(-1371.26,-1737.83) 1(-1371.26,-1737.83) 1(-1371.26,-1737.73) 1(-1371.26,-1737.73) 1(-1371.26,-1735.39) 1(-1371.26,-1735.39) 1(-1371.26,-1735.35) 1(-1371.26,-1735.3) 1(-1371.26,-1735.26) 1(-1371.26,-1735.26) 1(-1371.26,-1736.85) 1(-1371.26,-1736.85) 1(-1371.26,-1736.75) 1(-1371.26,-1736.75) 1(-1371.26,-1735.2) 1(-1371.26,-1735.2) 1(-1371.26,-1735.09) 1(-1371.26,-1735.09) 1(-1371.25,-1735.2) 1(-1371.25,-1735.09) 1(-1371.21,-1737.83) 1(-1371.21,-1737.83) 1(-1371.21,-1737.73) 1(-1371.21,-1737.73) 1(-1371.2,-1736.85) 1(-1371.2,-1736.85) 1(-1371.2,-1736.75) 1(-1371.2,-1736.75) 1(-1371.2,-1737.83) 1(-1371.2,-1737.83) 1(-1371.2,-1737.73) 1(-1371.2,-1737.73) 1(-1371.2,-1736.85) 1(-1371.2,-1736.85) 1(-1371.2,-1736.75) 1(-1371.2,-1736.75) 1(-1371.18,-1736.38) 1(-1371.18,-1736.38) 1(-1371.18,-1736.27) 1(-1371.18,-1736.27) 1(-1371.16,-1735.2) 1(-1371.16,-1735.09) 1(-1371.16,-1735.39) 1(-1371.16,-1735.26) 1(-1371.16,-1735.2) 1(-1371.16,-1735.2) 1(-1371.16,-1735.09) 1(-1371.16,-1735.09) 1(-1371.15,-1737.83) 1(-1371.15,-1737.83) 1(-1371.15,-1737.73) 1(-1371.15,-1737.73) 1(-1371.14,-1736.85) 1(-1371.14,-1736.85) 1(-1371.14,-1736.75) 1(-1371.14,-1736.75) 1(-1371.14,-1735.16) 1(-1371.14,-1735.16) 1(-1371.14,-1735.06) 1(-1371.14,-1735.06) 1(-1371.14,-1737.83) 1(-1371.14,-1737.83) 1(-1371.14,-1737.73) 1(-1371.14,-1737.73) 1(-1371.14,-1736.85) 1(-1371.14,-1736.85) 1(-1371.14,-1736.75) 1(-1371.14,-1736.75) 1(-1371.13,-1735.36) 1(-1371.13,-1735.36) 1(-1371.13,-1735.3) 1(-1371.13,-1735.3) 1(-1371.13,-1735.29) 1(-1371.13,-1735.29) 1(-1371.13,-1735.23) 1(-1371.13,-1735.23) 1(-1371.12,-1736.63) 1(-1371.12,-1736.63) 1(-1371.12,-1736.41) 1(-1371.12,-1736.41) 1(-1371.1,-1736.54) 1(-1371.09,-1738.19) 1(-1371.09,-1738.19) 1(-1371.09,-1737.97) 1(-1371.09,-1737.97) 1(-1371.09,-1735.16) 1(-1371.09,-1735.16) 1(-1371.09,-1735.06) 1(-1371.09,-1735.06) 1(-1371.09,-1737.83) 1(-1371.09,-1737.83) 1(-1371.09,-1737.73) 1(-1371.09,-1737.73) 1(-1371.08,-1736.85) 1(-1371.08,-1736.85) 1(-1371.08,-1736.75) 1(-1371.08,-1736.75) 1(-1371.08,-1737.83) 1(-1371.08,-1737.83) 1(-1371.08,-1737.73) 1(-1371.08,-1737.73) 1(-1371.08,-1735.16) 1(-1371.08,-1735.16) 1(-1371.08,-1735.06) 1(-1371.08,-1735.06) 1(-1371.07,-1736.85) 1(-1371.07,-1736.85) 1(-1371.07,-1736.75) 1(-1371.07,-1736.75) 1(-1371.03,-1735.16) 1(-1371.03,-1735.16) 1(-1371.03,-1735.06) 1(-1371.03,-1735.06) 1(-1371.03,-1735.06) 1(-1371.03,-1735.06) 1(-1371.03,-1735.36) 1(-1371.03,-1735.36) 1(-1371.03,-1735.3) 1(-1371.03,-1735.3) 1(-1371.03,-1735.29) 1(-1371.03,-1735.29) 1(-1371.03,-1735.23) 1(-1371.03,-1735.23) 1(-1371.03,-1737.83) 1(-1371.03,-1737.83) 1(-1371.03,-1737.73) 1(-1371.03,-1737.73) 1(-1371.02,-1736.85) 1(-1371.02,-1736.85) 1(-1371.02,-1736.75) 1(-1371.02,-1736.75) 1(-1371.02,-1737.83) 1(-1371.02,-1737.83) 1(-1371.02,-1737.73) 1(-1371.02,-1737.73) 1(-1371.01,-1737.58) 1(-1371.01,-1737.58) 1(-1371.01,-1737.46) 1(-1371.01,-1737.46) 1(-1371.01,-1736.85) 1(-1371.01,-1736.85) 1(-1371.01,-1736.75) 1(-1371.01,-1736.75) 1(-1371.01,-1737.13) 1(-1371.01,-1737.13) 1(-1371.01,-1737.01) 1(-1371.01,-1737.01) 1(-1371.01,-1735.21) 1(-1371.01,-1735.21) 1(-1371.01,-1735.09) 1(-1371.01,-1735.09) 1(-1371,-1735.21) 1(-1371,-1735.09) 1(-1370.99,-1735.39) 1(-1370.99,-1735.26) 1(-1370.98,-1737.2) 1(-1370.98,-1737.2) 1(-1370.98,-1737.09) 1(-1370.98,-1737.09) 1(-1370.96,-1737.83) 1(-1370.96,-1737.83) 1(-1370.96,-1737.73) 1(-1370.96,-1737.73) 1(-1370.96,-1736.85) 1(-1370.96,-1736.85) 1(-1370.96,-1736.75) 1(-1370.96,-1736.75) 1(-1370.94,-1737.2) 1(-1370.94,-1737.2) 1(-1370.94,-1737.1) 1(-1370.94,-1737.1) 1(-1370.94,-1737.09) 1(-1370.94,-1737.09) 1(-1370.92,-1735.21) 1(-1370.92,-1735.09) 1(-1370.91,-1735.21) 1(-1370.91,-1735.21) 1(-1370.91,-1735.09) 1(-1370.91,-1735.09) 1(-1370.89,-1735.39) 1(-1370.89,-1735.39) 1(-1370.89,-1735.35) 1(-1370.89,-1735.3) 1(-1370.89,-1735.26) 1(-1370.89,-1735.26) 1(-1370.87,-1735.12) 1(-1370.87,-1735.07) 1(-1370.84,-1735.32) 1(-1370.83,-1735.32) 1(-1370.82,-1735.19) 1(-1370.81,-1737.26) 1(-1370.81,-1737.26) 1(-1370.81,-1736.38) 1(-1370.81,-1736.38) 1(-1370.81,-1735.9) 1(-1370.81,-1735.9) 1(-1370.81,-1735.58) 1(-1370.81,-1735.58) 1(-1370.81,-1738.2) 1(-1370.81,-1738.2) 1(-1370.81,-1737.32) 1(-1370.81,-1737.32) 1(-1370.81,-1736.01) 1(-1370.81,-1736.01) 1(-1370.81,-1735.91) 1(-1370.81,-1735.91) 1(-1370.8,-1735.55) 1(-1370.8,-1735.55) 1(-1370.8,-1735.46) 1(-1370.8,-1735.46) 1(-1370.78,-1735.19) 1(-1370.75,-1736.01) 1(-1370.75,-1736.01) 1(-1370.75,-1735.91) 1(-1370.75,-1735.91) 1(-1370.74,-1735.55) 1(-1370.74,-1735.55) 1(-1370.74,-1735.46) 1(-1370.74,-1735.46) 1(-1370.74,-1735.9) 1(-1370.74,-1735.9) 1(-1370.74,-1735.58) 1(-1370.74,-1735.58) 1(-1370.73,-1735.9) 1(-1370.73,-1735.9) 1(-1370.73,-1735.58) 1(-1370.73,-1735.58) 1(-1370.73,-1735.55) 1(-1370.73,-1735.55) 1(-1370.73,-1735.46) 1(-1370.73,-1735.46) 1(-1370.72,-1737.29) 1(-1370.72,-1736.01) 1(-1370.72,-1736.01) 1(-1370.72,-1735.91) 1(-1370.72,-1735.91) 1(-1370.72,-1738.23) 1(-1370.67,-1735.55) 1(-1370.67,-1735.55) 1(-1370.67,-1735.46) 1(-1370.67,-1735.46) 1(-1370.67,-1736.01) 1(-1370.67,-1736.01) 1(-1370.67,-1735.91) 1(-1370.67,-1735.91) 1(-1370.66,-1735.9) 1(-1370.66,-1735.9) 1(-1370.66,-1735.58) 1(-1370.66,-1735.58) 1(-1370.64,-1735.19) 1(-1370.6,-1735.19) 1(-1370.59,-1737.26) 1(-1370.59,-1737.26) 1(-1370.59,-1736.38) 1(-1370.59,-1736.38) 1(-1370.58,-1738.2) 1(-1370.58,-1738.2) 1(-1370.58,-1737.32) 1(-1370.58,-1737.32) 1(-1370.55,-1735.12) 1(-1370.55,-1735.07)